# Altium PCB ffultra_pcb_attempt2.PcbDoc (part 2 of 3)
Units mil, origin at the board's own origin, x right, y up, seen from the top; angles counter-clockwise.
Board outline 1102.36 x 2165.35 mil, 6 copper layers (Top, GND-T, Inner, Power, GND-B, Bottom), stack 60.567 mil thick; 114 components, 86 nets, 459 pads, 324 vias.
Unrouted connection lines stored in the file: 9.
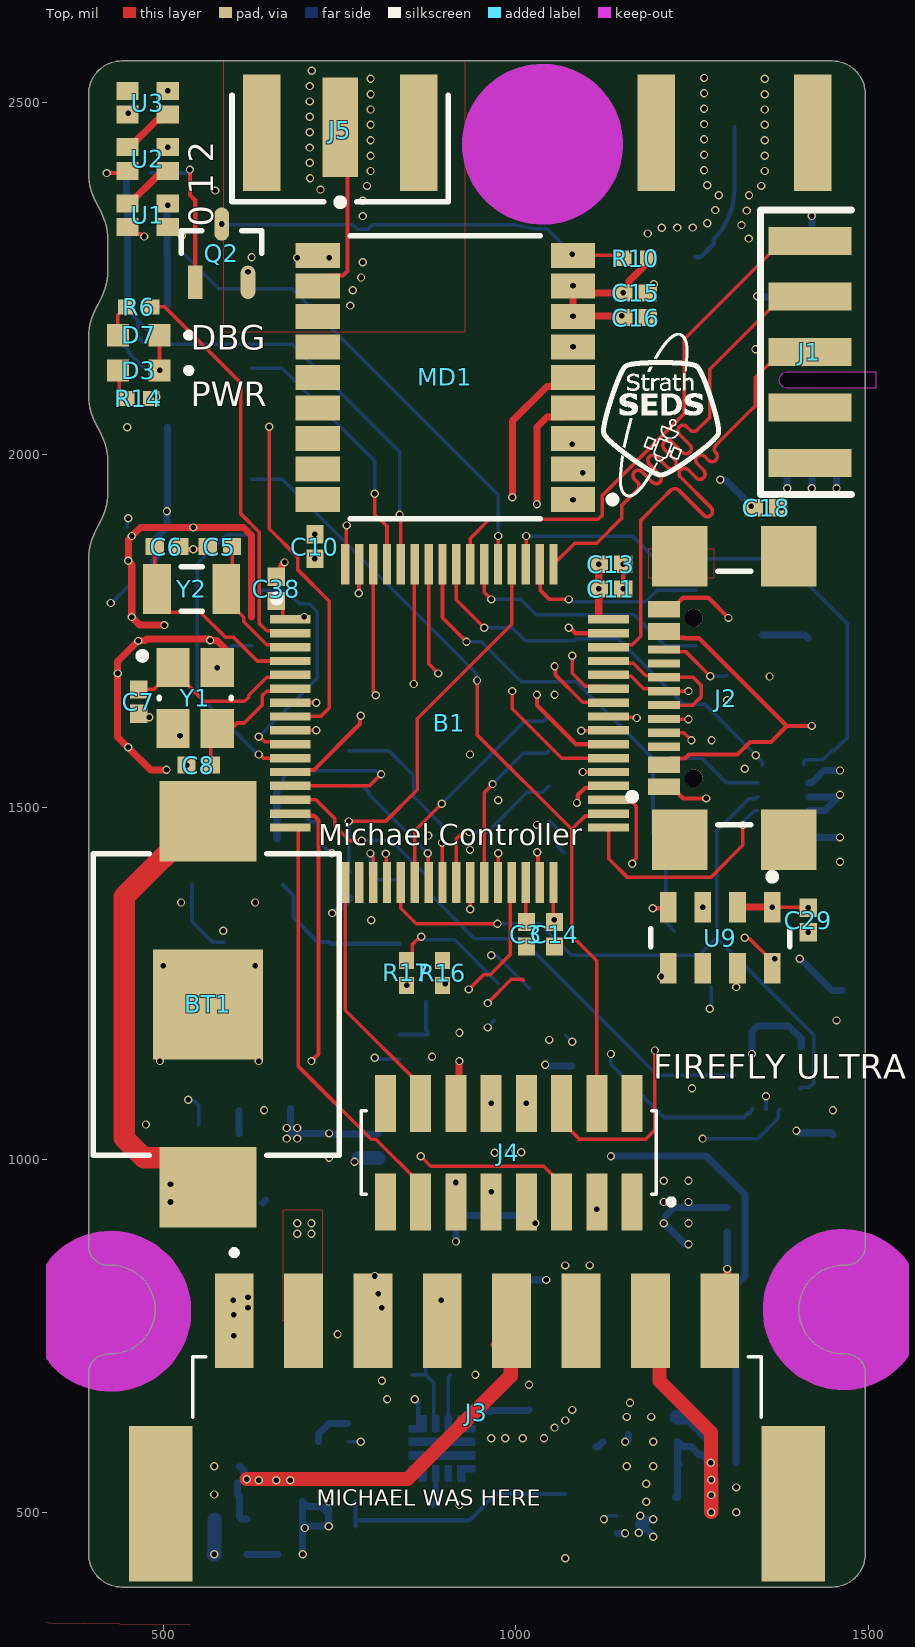
[diagram p0: Top view]

## Via types
v1: diameter 11.81, hole 7.87, Top to Bottom, tented both sides, 324 vias

## Nets (pads, with @x,y where several pads share a name; then routed paths per layer and width w, separated by ;. In a path a pad name is that pad's centre, name@x,y a point inside that pad or via, vN(x,y) a via of type N, cw(c..) or ccw(c..) an arc to the next point about the centre after c; other vN are vias at no path point) (continued)
CONT_CH2: (continued)
  Top w5: B1.26@935.31,1393.19 935.41,1393.09 935.41,1355.61 v1(935.51,1355.51)
  Inner w5: v1(935.51,1355.51) 955.61,1335.42 955.61,1325.42 1105.1,1175.93 1105.1,1034.9 v1(1135,1005)
  Bottom w10: v1(1135,1005) 1270.73,1005 1325.08,950.65 1325.08,835.08 1312.72,822.72 R37_CH2.2@1312.72,605 R35_CH2.1@1312.72,570
DEBUG_LED: B1.2 R6.1 | length 573.5
  Top w5: 482.72,2210 502.03,2210 610,2102.03 610,1916.34 636.04,1890.3 636.04,1760.96 646.55,1750.45 676.48,1750.45 B1.2@679.88,1747.05
EN_CH1: B1.36 U11_CH1.5 | length 1243.6
  Top w6: v1(1086.75,1506.23) 1087.86,1507.34 1087.86,1517.32 1098.15,1527.61 1128.79,1527.61 B1.36@1131.69,1530.51
  Inner w6: v1(780,600) 780.22,600 786.42,606.2 906.2,606.2 974.62,674.62 974.62,689.62 1160,875 1160,1210 1086.75,1283.25 v1(1086.75,1506.23)
  Bottom w5: U11_CH1.5@761.46,600 v1(780,600)